# Altium PCB PCB1.PcbDoc
Units mil, origin at the board's own origin, x right, y up, seen from the top; angles counter-clockwise.
Board outline 3166.7 x 2714.2 mil, 2 copper layers (Top Layer, Bottom Layer); 43 components, 25 nets, 95 pads, 411 vias.
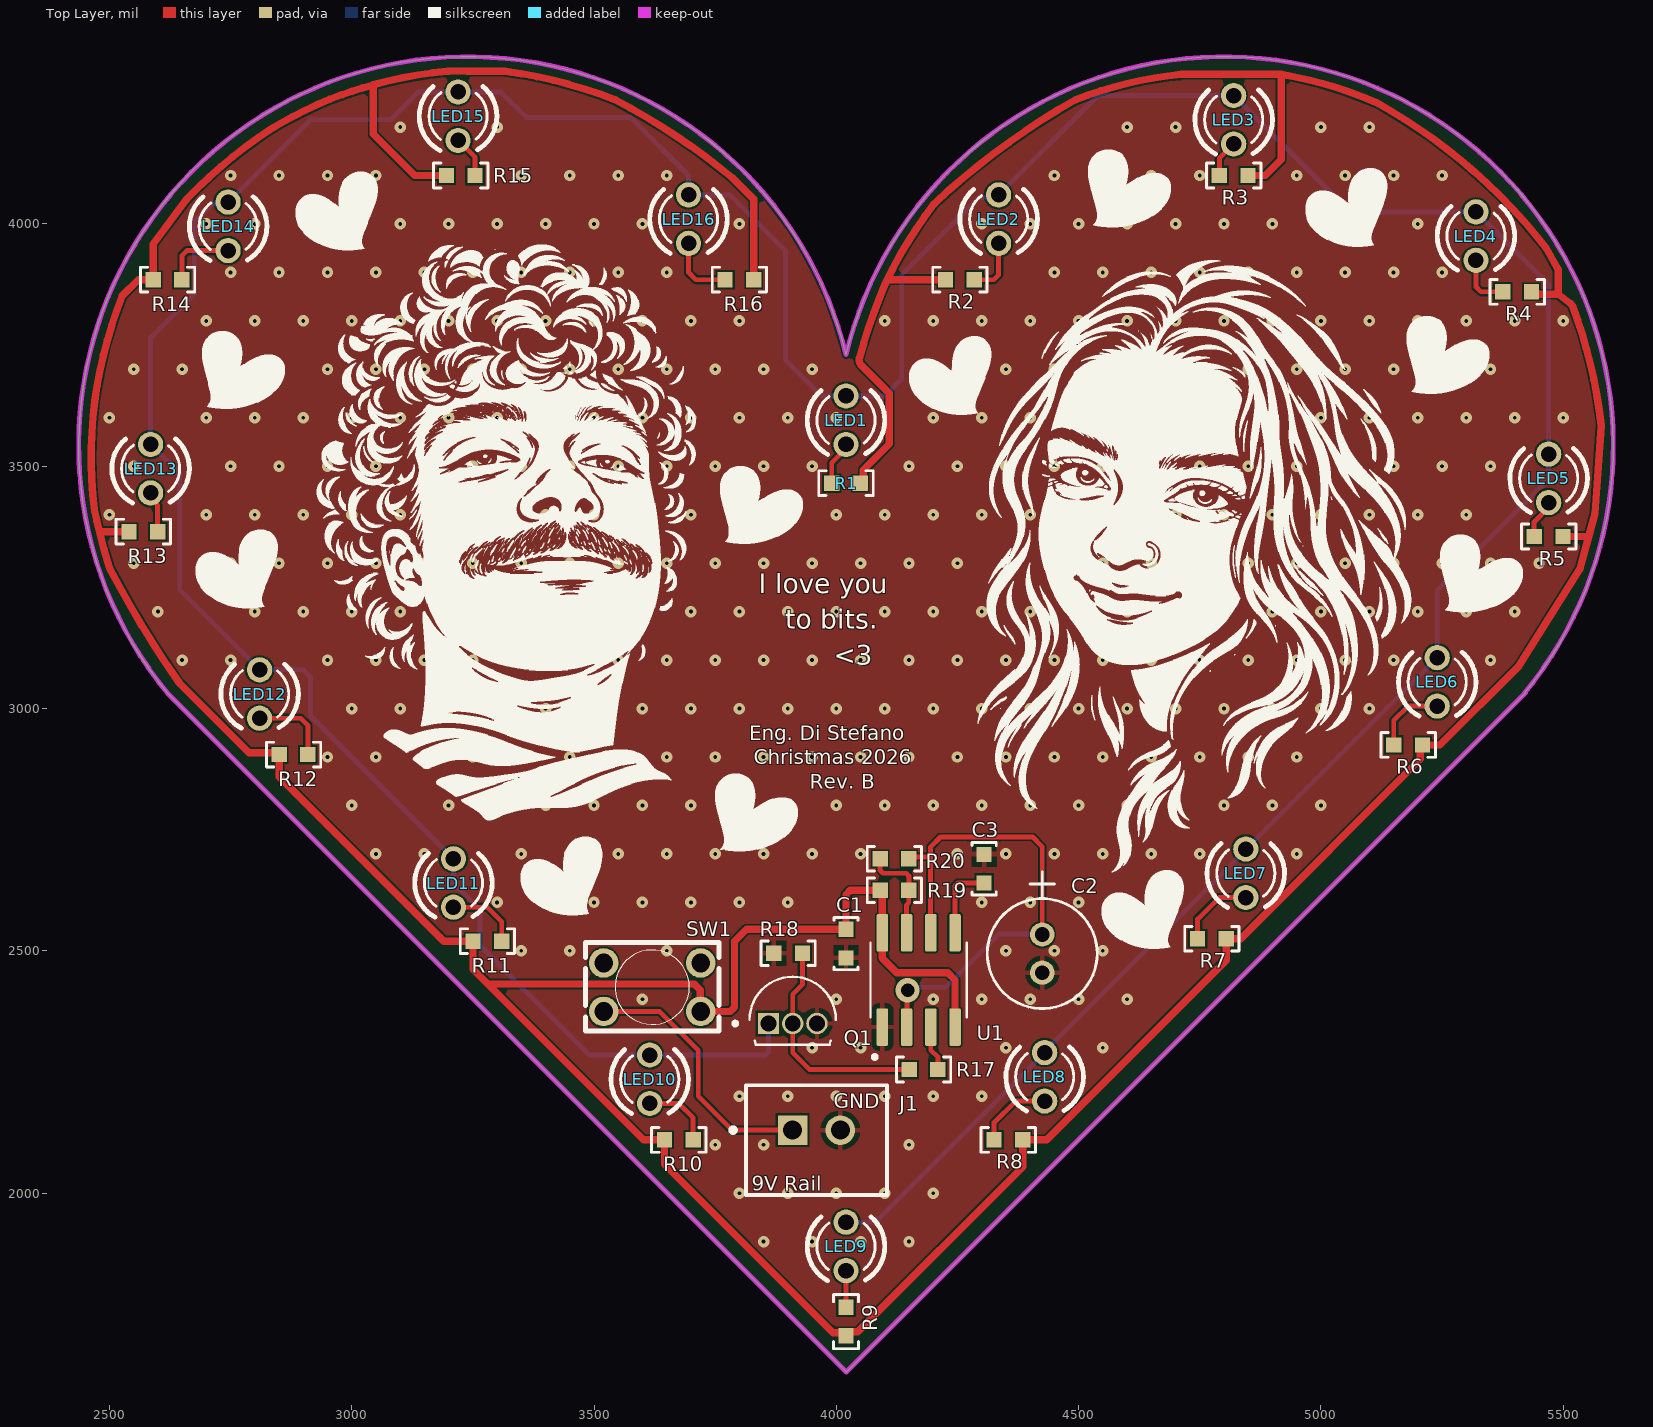
[diagram p0: Top Layer view]
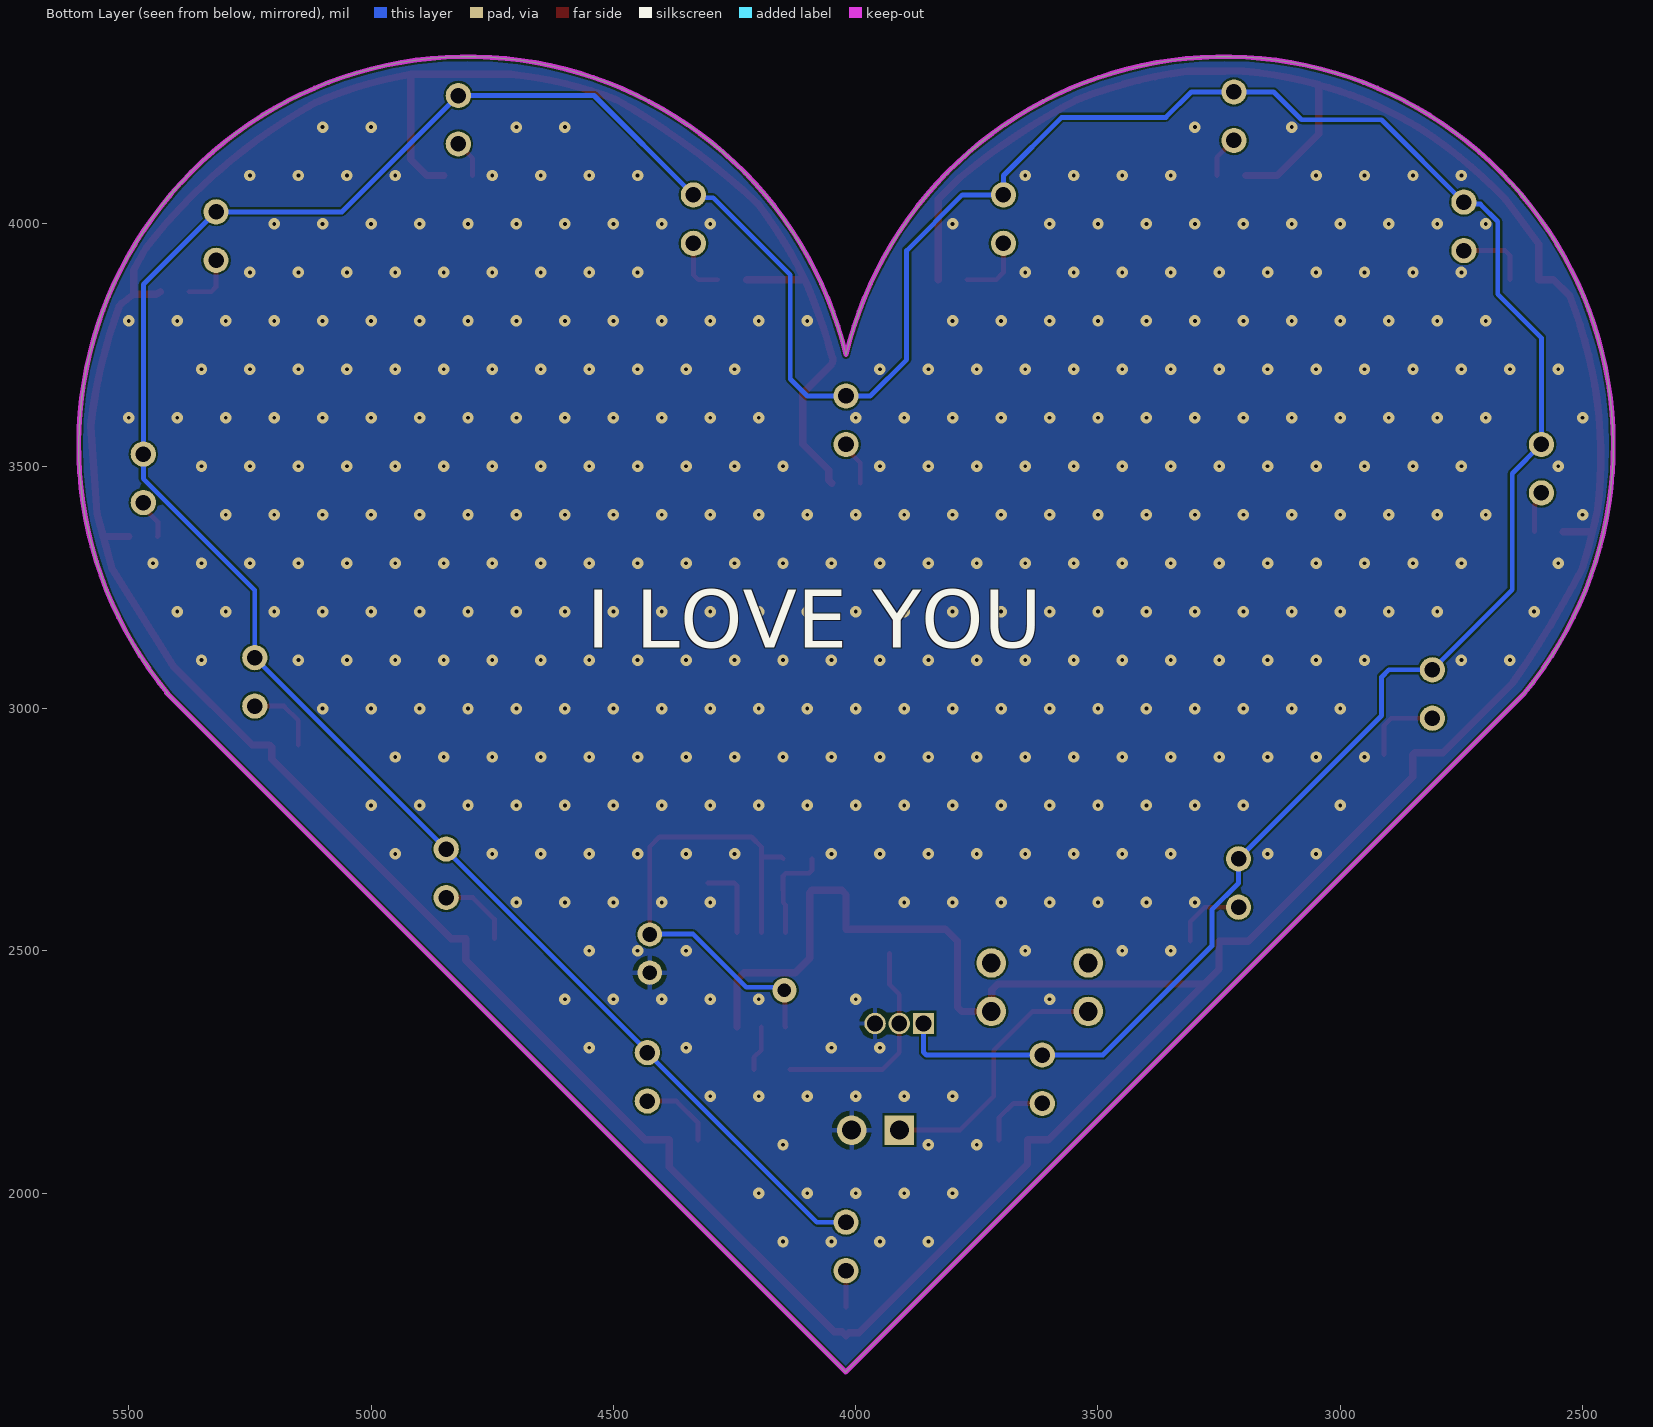
[diagram p1: Bottom Layer view, seen from below]
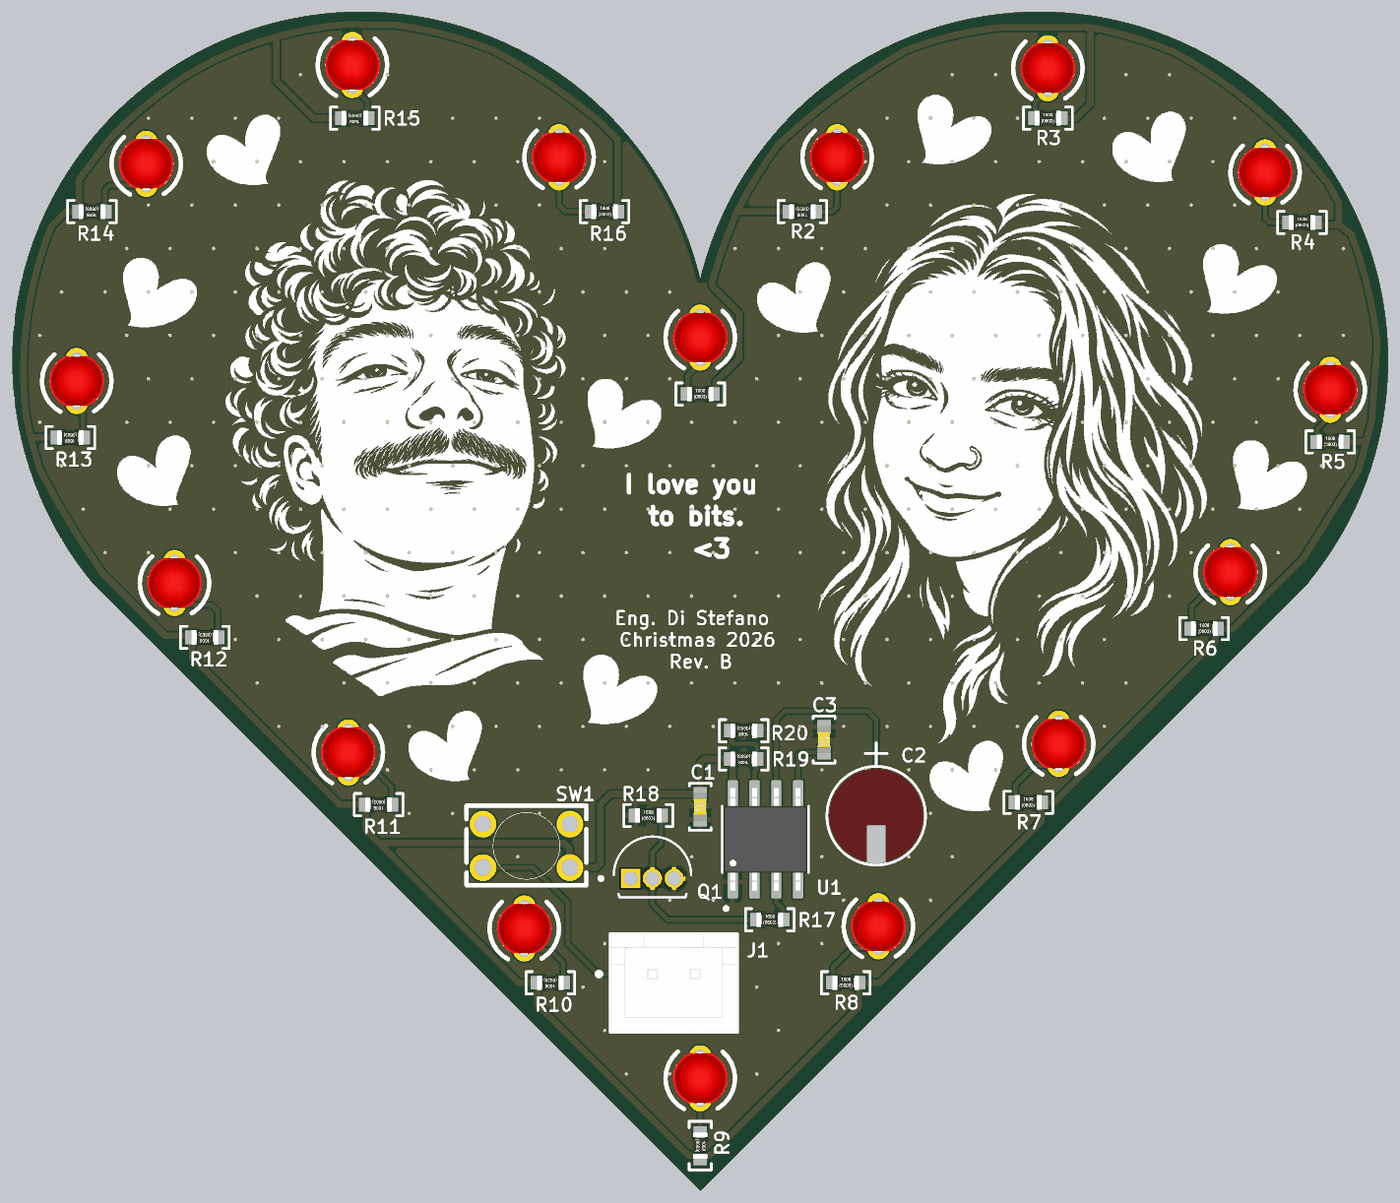
[diagram p2: 3D render of the assembled board from above, using the file's embedded part models]

## Layer stack, top to bottom
Top Solder: solder mask 0.4, Solder Resist, Dk 3.5
Top Layer: signal copper 1.4
Dielectric 1: dielectric 12.6, FR-4, Dk 4.8
Bottom Layer: signal copper 1.4
Bottom Solder: solder mask 0.4, Solder Resist, Dk 3.5

## Board outline
2619.71,3032.11 4020.91,1630.91 5422.11,3032.11 5420.29,3032.11 ccw(c4800.58,3542.44) 4020,3730 ccw(c3239.42,3542.44)

## Design rules (kind name [scope] priority, off if disabled: settings)
Clearance [All] p1: gap=4 ignorepadtopadclearanceinfootprint=FALSE
PolygonConnect PolygonConnect_1 [InNet('GND') vs InNet('GND')] p1: thpad.connectstyle=Relief thpad.reliefconductorwidth=10 thpad.reliefentries=4 thpad.polygonreliefangle="90 Angle" thpad.airgapwidth=10 smdpad.connectstyle=Relief smdpad.reliefconductorwidth=10 smdpad.reliefentries=4 smdpad.polygonreliefangle="90 Angle" smdpad.airgapwidth=10 via.connectstyle=Direct via.reliefconductorwidth=10 via.reliefentries=4 via.polygonreliefangle="90 Angle" via.airgapwidth=10
PolygonConnect [All] p2: connectstyle=Relief reliefconductorwidth=10 reliefentries=4 polygonreliefangle="90 Angle" airgapwidth=10
RoutingVias [All] p1: holewidth=28 width=50 viastyle="Through Hole" minholewidth=28 minwidth=50 maxholewidth=28 maxwidth=50
SilkToSilkClearance [All] p1 off: silktosilkclearance=10
SilkToSolderMaskClearance [IsPad] p1 off: minsilkscreentomaskgap=10 clearancetoexposedcopper=TRUE
SolderMaskExpansion [All] p1: expansion=0 istentingtop=FALSE
SupplyNets "Schematic Supply Nets_1" [InNet('9V')] p1: voltage=0.000
SupplyNets "Schematic Supply Nets" [InNet('GND')] p2: voltage=0.000
Width Width_1 [InNet('9V')] p1: maxlimit=15 minlimit=15 preferedwidth=15 minimp=50.000000 maximp=50.000000 favimp=50.000000
Width [All] p2: maxlimit=10 minlimit=10 preferedwidth=10
28 further rules are at their usual default settings.

## Components (designator, comment, footprint, x,y, rotation, side; value= is the part's Value field where it differs from the comment)
C1 "CAP CER 100nF 50V 0603" C_1608[0603] 4020,2515 r90 top value=100nF
C2 "10uf" CAP_PKPZ_5X11_LOW_RUB 4425,2533.74 r270 top
C3 "CAP CER 100nF 50V 0603" C_1608[0603] 4305,2669.53 r270 top value=10nF
J1 "B2B-XH-A(LF)(SN)" J_B2B-XH-A_LF_JST 3959.21,2109.33 r0 top value="Conn_01x02 TH"
LED1 "TLLR4400" LED3MM 4020,3595 r90 top
LED2 "TLLR4400" LED3MM 4335,4010 r90 top
LED3 "TLLR4400" LED3MM 4820,4215 r90 top
LED4 "TLLR4400" LED3MM 5320,3975 r90 top
LED5 "TLLR4400" LED3MM 5470,3475 r90 top
LED6 "TLLR4400" LED3MM 5240,3055 r90 top
LED7 "TLLR4400" LED3MM 4845,2660 r90 top
LED8 "TLLR4400" LED3MM 4430,2240 r90 top
LED9 "TLLR4400" LED3MM 4020,1890 r90 top
LED10 "TLLR4400" LED3MM 3615,2235 r90 top
LED11 "TLLR4400" LED3MM 3210,2640 r90 top
LED12 "TLLR4400" LED3MM 2810,3030 r90 top
LED13 "TLLR4400" LED3MM 2585,3495 r90 top
LED14 "TLLR4400" LED3MM 2745,3995 r90 top
LED15 "TLLR4400" LED3MM 3219.47,4222.34 r90 top
LED16 "TLLR4400" LED3MM 3695,4010 r90 top
Q1 "BS170" TO92127P478H483-3 3910,2350 r0 top
R1 "Res 10k 1% 0603" R_1608[0603] 4020,3465 r0 top value=3k3
R2 "Res 10k 1% 0603" R_1608[0603] 4255,3885 r180 top value=3k3
R3 "Res 10k 1% 0603" R_1608[0603] 4820,4100 r0 top value=3k3
R4 "Res 10k 1% 0603" R_1608[0603] 5405,3860 r0 top value=3k3
R5 "Res 10k 1% 0603" R_1608[0603] 5470,3355 r0 top value=3k3
R6 "Res 10k 1% 0603" R_1608[0603] 5180,2925 r0 top value=3k3
R7 "Res 10k 1% 0603" R_1608[0603] 4775,2525 r0 top value=3k3
R8 "Res 10k 1% 0603" R_1608[0603] 4355,2110 r0 top value=3k3
R9 "Res 10k 1% 0603" R_1608[0603] 4020,1735 r270 top value=3k3
R10 "Res 10k 1% 0603" R_1608[0603] 3675,2110 r180 top value=3k3
R11 "Res 10k 1% 0603" R_1608[0603] 3280,2520 r180 top value=3k3
R12 "Res 10k 1% 0603" R_1608[0603] 2880,2905 r180 top value=3k3
R13 "Res 10k 1% 0603" R_1608[0603] 2570,3365 r180 top value=3k3
R14 "Res 10k 1% 0603" R_1608[0603] 2620,3885 r180 top value=3k3
R15 "Res 10k 1% 0603" R_1608[0603] 3225,4100 r180 top value=3k3
R16 "Res 10k 1% 0603" R_1608[0603] 3800,3885 r0 top value=3k3
R17 "Res 10k 1% 0603" R_1608[0603] 4180,2255 r0 top value=220
R18 "Res 10k 1% 0603" R_1608[0603] 3900.47,2495 r0 top value=100k
R19 "Res 10k 1% 0603" R_1608[0603] 4120,2625 r180 top value=10k
R20 "Res 10k 1% 0603" R_1608[0603] 4120,2690 r180 top value=63k
SW1 "CST10T2CR" CST10T2CR 3620,2425 r0 top
U1 "LMC555" SOIC127P599X175-8N 4170,2440 r90 top

## Footprints (in the part's own frame and the unit in brackets; to place one, negate y for a bottom-side part, rotate by r counter-clockwise, add the part's x,y. Pads: shape width x height; smd on the part's side, far side on the other; paste and mask are expansions set on the pad)
C_1608[0603] [mm] "Capacitor MLCC; Body 1.6 x 0.8 mm (LxW typ)"
  rect 0.8x0.8 smd: 1(-0.75,0) 2(0.75,0)
  silkscreen extent -1.38,-0.64 1.38,0.64, body extent -0.8,-0.4 0.8,0.4, height 0.8
CAP_PKPZ_5X11_LOW_RUB [mil]
  round 50 / inner round 60 / far side round 50 hole 30 paste-99999 mask+0: 1(0,0) 2(78.74,0)
  silkscreen extent -129,-113 153,114, body extent -69,-108 149,108, height 493
CST10T2CR [mm] "Toggle Switches. CST10T2CR"
  round 1.55 hole 0.98: 1(-2.54,-1.27) 3(2.54,-1.27) 4(2.54,1.27) 6(-2.54,1.27)
  silkscreen extent -3.5,-2.3 3.5,2.35
J_B2B-XH-A_LF_JST [mm]
  rect 1.55x1.55 hole 1 paste-2539.97 mask+0: 1(-1.25,0.525)
  round 1.55 hole 1 paste-2539.97 mask+0: 2(1.25,0.525)
  silkscreen extent -4.5,-2.88 3.7,2.88, body extent -3.8,-2.98 3.8,2.98, height 0.25
LED3MM [mil]
  round 52 hole 32: A(-50,0) K(50,0)
  silkscreen extent -71,-80 61,80, body extent -60,-62 60,62, height 240
R_1608[0603] [mm] "Chip Resistor; Body 1.6 x 0.8 mm (LxW typ)"
  rect 0.8x0.8 smd: 1(-0.75,0) 2(0.75,0)
  silkscreen extent -1.43,-0.65 1.43,0.65, body extent -0.77,-0.42 0.78,0.43, height 0.45
SOIC127P599X175-8N [mm]
  rrect25% 1.97x0.6 smd: 1(-2.47,1.905) 2(-2.47,0.635) 3(-2.47,-0.635) 4(-2.47,-1.905) 5(2.47,-1.905) 6(2.47,-0.635) 7(2.47,0.635) 8(2.47,1.905)
  silkscreen extent -4.14,-2.52 1.95,2.52, body extent -3,-2.45 3,2.45, height 1.75
TO92127P478H483-3 [mm]
  rect 1.12x1.12 / inner round 1.12 / far side rect 1.12x1.12 hole 0.83 mask+0.102: 1(-1.27,0)
  round 1.12 hole 0.83 mask+0.102: 2(0,0) 3(1.27,0)
  silkscreen extent -3.11,-1.1 2.26,2.45

## Part data
C1 C3: library part CAP002, "Capacitor type 1", Dielectric=X7R, Manufacturer 1=Yageo, Manufacturer Part Number 1=CC0603KRX7R9BB104, Rated Voltage=50V, Supplier Part Number 1=C14663, Tolerance=10%, Code CEGEP=COND0143SM, LibRef=CAP002, Mounting Technology=SMT, Supplier 1=LCSC
C2: library part 50PK10MEFC5X11, "Description", Manufacturer_Name=Rubycon, Copyright="Copyright (C) 2025 Ultra Librarian. All rights reserved.", Manufacturer_Part_Number=50PK10MEFC5X11
J1: library part CONN-2MM-01X02-B2B, "Conn. 2 pins JST B2B TH Straight 2mm", Manufacturer 1=JST, Supplier Part Number 1=C158012, Manufacturer Part Number 1=B2B-XH-A(LF)(SN), Mounting Technology=SMT, Supplier 1=LCSC, Supplier 2=Farnell, Supplier Part Number 2=1516276
LED1 LED2 LED3 LED4 LED5 LED6 LED7 LED8 LED9 LED10 LED11 LED12 LED13 LED14 LED15 LED16: "Red 619nm LED Indication - Discrete 1.9V Radial", Package=None, Check_prices=https://www.snapeda.com/parts/TLLR4400/Vishay+Semiconductor+Opto+Division/view-part/?ref=eda, MF=Vishay, MP=TLLR4400, SnapEDA_Link=https://www.snapeda.com/parts/TLLR4400/Vishay+Semiconductor+Opto+Division/view-part/?ref=snap
Q1: "N-Channel 60 V 500mA (Ta) 830mW (Ta) Through Hole TO-92-3", Manufacturer=ON, Package=Package, DATASHEET_URL=https://s3.amazonaws.com/snapeda/datasheet/BS170_NTE_Electronics-_Inc.pdf, MPN=BS170, SOURCE_URL=https://www.snapeda.com/parts/BS170/Onsemi/view-part/
R1 R2 R3 R4 R5 R6 R7 R8 R9 R10 R11 R12 R13 R14 R15 R16 R17 R18 R19 R20: library part RES001, "Resistor type 1", Manufacturer 1=Yageo, Manufacturer Part Number 1=RC0603FR-0710KL, Max Working Voltage=75V, Supplier Part Number 1=C98220, Tolerance=1%, Code CEGEP=RESI0238-0603, LibRef=RES001, Mounting Technology=SMT, Puissance=1/10W, Supplier 1=LCSC
SW1: "Toggle Switches. CST10T2CR", JLCPCB Part #=C4949894, Manufacturer="CIT Relay and Switch", Component Type=Switches, Design Item ID=CST10T2CR, Manufacturer Part Number=CST10T2CR
U1: library part LM555CM/NOPB, "Highly Stable 555 Timer", Package="SOIC-8 Texas Instruments", Check_prices=https://www.snapeda.com/parts/LM555CM/NOPB/Texas+Instruments/view-part/?ref=eda, MF="Texas Instruments", MP=LM555CM/NOPB, SnapEDA_Link=https://www.snapeda.com/parts/LM555CM/NOPB/Texas+Instruments/view-part/?ref=snap

## Via types
v1: diameter 23.62, hole 7.8, Top Layer to Bottom Layer, tented both sides, 410 vias
v2: diameter 50, hole 28, Top Layer to Bottom Layer, tented both sides, 1 vias

## Nets (pads, with @x,y where several pads share a name; then routed paths per layer and width w, separated by ;. In a path a pad name is that pad's centre, name@x,y a point inside that pad or via, vN(x,y) a via of type N, cw(c..) or ccw(c..) an arc to the next point about the centre after c; other vN are vias at no path point)
9V: C1.2 R1.2 R2.2 R3.2 R4.2 R5.2 R6.2 R7.2 R8.2 R9.2 R10.2 R11.2 R12.2 R13.2 R14.2 R15.2 R16.2 R19.2 SW1.3 U1.4 U1.8 | length 12058.7
  Top Layer w15: R13.2 2479.5,3365 2479.33,3364.83 ; R15.2 3130,4100 3044.39,4185.61 3044.39,4287.2 ; 3785.23,4095.27 3829.53,4050.98 R16.2 ; 3785.23,4095.28 ccw(c2894.2,3020.08) 3543.97,4256.12 ccw(c3191.45,3363.52) 3316.08,4315.08 3238.25,4315.08 3237.49,4315.84 3201.45,4315.84 3200.69,4315.08 3197.52,4315.08 ccw(c3271.57,3473.8) 3044.39,4287.2 ; R1.2 4055.55,3471.03 4055.55,3492.29 4109.33,3546.07 4109.33,3650.67 4051.35,3708.65 cw(c4061.96,3719.25) 4047.48,3723.17 cw(c5203.85,3404.01) 4101.77,3877.79 cw(c4115.52,3871.81) 4108.38,3885 R2.2 ; 4102.67,3881.27 cw(c5014.52,3429.54) 4201.24,4041.18 cw(c5259.67,2909.59) 4202.2,4042.09 cw(c5259.67,2909.59) 4492.66,4255.87 cw(c4793.7,3489.81) 4711.49,4308.79 4917.8,4308.79 cw(c4771.42,3444.15) 4917.96,4308.76 ; U1.4 4245,2440 4230,2455 4125,2455 4095,2485 U1.8 4095,2620.47 R19.2 4028.79,2625 4020,2616.21 C1.2 3814.53,2544.53 3790,2520 3790,2383.79 3781.21,2375 SW1.3 3719.21,2375.79 3719.21,2419.18 3706.89,2431.5 3280.82,2431.5 ; R3.2 4885,4100 4917.95,4132.95 4917.95,4308.74 ; R4.2 5442.78,3855 5488.11,3855 5489.59,3855 5489.6,3905.31 5464.52,3950.67 ccw(c4558.97,3246.87) 5463.79,3951.6 ccw(c4558.97,3246.87) 5113.43,4250.82 ccw(c4775.96,3470.94) 4917.96,4308.76 ; 5489.59,3854.93 5515.38,3835.24 5516.18,3834.63 5516.89,3833.93 5519.21,3831.61 cw(c4542.65,3467.28) 5578.36,3584.32 5578.26,3582.94 5566.5,3416.7 5565.56,3403.4 ; R5.2 5549.73,3355 5553.73,3359.01 ; 5565.16,3401.9 5553.73,3359.01 ; 2479.33,3364.83 ccw(c3823.05,3701.71) 2500.12,3290.72 ccw(c4320.71,4230.71) 2644.12,3052.93 2788,2909.05 2846.42,2909.05 R12.2 2850.47,2859.53 3190,2520 R11.2 3250.47,2461.85 3280.82,2431.5 ; 2479.33,3364.83 cw(c3823.05,3701.71) 2469.16,3408.4 2469.01,3409.08 cw(c3361.36,3517.93) 2526.62,3851.62 2560,3885 R14.2 2590.47,3958.63 2659.44,4051.07 cw(c3395.32,3345.68) 2660.08,4051.75 cw(c3395.32,3345.68) 2832.3,4195.45 cw(c3267.63,3483.91) 2980.35,4267.03 2980.72,4266.67 cw(c3271.57,3473.8) 3044.39,4287.2 ; 3280.82,2431.5 3602.32,2110 R10.2 3645.47,2059.86 3993.27,1712.06 4013.41,1712.06 R9.2 4028.25,1713.72 4044.31,1713.72 4384.53,2053.94 R8.2 4434.1,2110 4804.53,2480.43 R7.2 4834.32,2525 5205.27,2895.95 5205.27,2920.74 R6.2 5245.82,2925 5408.34,3087.52 5534.37,3287.62 5535.06,3288.94 5553.73,3359.01
GND: C1.1 C2.2 C3.1 J1.2 Q1.3 R18.1 U1.1
  other v1: 3850,1900 3950,1900 4050,1900 4150,1900 3800,2000 3900,2000 4000,2000 4100,2000 4200,2000 3750,2100 3850,2100 4150,2100 3800,2200 3900,2200 4000,2200 4100,2200 4200,2200 4300,2200 3950,2300 4050,2300 4350,2300 4550,2300 3600,2400 4000,2400 4200,2400 4300,2400 4400,2400 4500,2400 4600,2400 3350,2500 3450,2500 3650,2500 4350,2500 4450,2500 4550,2500 3300,2600 3400,2600 3500,2600 3600,2600 3700,2600 3800,2600 3900,2600 4300,2600 4400,2600 4500,2600 4600,2600 4700,2600 3050,2700 3150,2700 3350,2700 3450,2700 3550,2700 3650,2700 3750,2700 3850,2700 3950,2700 4050,2700 4250,2700 4350,2700 4450,2700 4550,2700 4650,2700 4750,2700 4950,2700 3000,2800 3200,2800 3300,2800 3400,2800 3500,2800 3600,2800 3700,2800 3800,2800 3900,2800 4000,2800 4100,2800 4200,2800 4300,2800 4400,2800 4500,2800 4600,2800 4700,2800 4800,2800 4900,2800 5000,2800 2950,2900 3050,2900 3150,2900 3250,2900 3350,2900 3450,2900 3550,2900 3650,2900 3750,2900 3850,2900 3950,2900 4050,2900 4150,2900 4250,2900 4350,2900 4450,2900 4550,2900 4650,2900 4750,2900 4850,2900 4950,2900 3000,3000 3100,3000 3200,3000 3300,3000 3400,3000 3500,3000 3600,3000 3700,3000 3800,3000 3900,3000 4000,3000 4100,3000 4200,3000 4300,3000 4400,3000 4500,3000 4600,3000 4700,3000 4800,3000 4900,3000 5000,3000 5100,3000 2650,3100 2750,3100 2950,3100 3050,3100 3150,3100 3250,3100 3350,3100 3450,3100 3550,3100 3650,3100 3750,3100 3850,3100 3950,3100 4050,3100 4150,3100 4250,3100 4350,3100 4450,3100 4550,3100 4650,3100 4750,3100 4850,3100 4950,3100 5050,3100 5150,3100 5350,3100 2600,3200 2800,3200 2900,3200 3000,3200 3100,3200 3200,3200 3300,3200 3400,3200 3500,3200 3600,3200 3700,3200 3800,3200 3900,3200 4000,3200 4100,3200 4200,3200 4300,3200 4400,3200 4500,3200 4600,3200 4700,3200 4800,3200 4900,3200 5000,3200 5100,3200 5200,3200 5300,3200 5400,3200 2550,3300 2750,3300 2850,3300 2950,3300 3050,3300 3150,3300 3250,3300 3350,3300 3450,3300 3550,3300 3650,3300 3750,3300 3850,3300 3950,3300 4050,3300 4150,3300 4250,3300 4350,3300 4450,3300 4550,3300 4650,3300 4750,3300 4850,3300 4950,3300 5050,3300 5150,3300 5250,3300 5350,3300 5450,3300 2500,3400 2700,3400 2800,3400 2900,3400 3000,3400 3100,3400 3200,3400 3300,3400 3400,3400 3500,3400 3600,3400 3700,3400 3800,3400 3900,3400 4000,3400 4100,3400 4200,3400 4300,3400 4400,3400 4500,3400 4600,3400 4700,3400 4800,3400 4900,3400 5000,3400 5100,3400 5200,3400 5300,3400 2550,3500 2750,3500 2850,3500 2950,3500 3050,3500 3150,3500 3250,3500 3350,3500 3450,3500 3550,3500 3650,3500 3750,3500 3850,3500 3950,3500 4150,3500 4250,3500 4350,3500 4450,3500 4550,3500 4650,3500 4750,3500 4850,3500 4950,3500 5050,3500 5150,3500 5250,3500 5350,3500 2500,3600 2700,3600 2800,3600 2900,3600 3000,3600 3100,3600 3200,3600 3300,3600 3400,3600 3500,3600 3600,3600 3700,3600 3800,3600 3900,3600 4000,3600 4200,3600 4300,3600 4400,3600 4500,3600 4600,3600 4700,3600 4800,3600 4900,3600 5000,3600 5100,3600 5200,3600 5300,3600 5400,3600 5500,3600 2550,3700 2650,3700 2750,3700 2850,3700 2950,3700 3050,3700 3150,3700 3250,3700 3350,3700 3450,3700 3550,3700 3650,3700 3750,3700 3850,3700 3950,3700 4250,3700 4350,3700 4450,3700 4550,3700 4650,3700 4750,3700 4850,3700 4950,3700 5050,3700 5150,3700 5250,3700 5350,3700 2700,3800 2800,3800 2900,3800 3000,3800 3100,3800 3200,3800 3300,3800 3400,3800 3500,3800 3600,3800 3700,3800 3800,3800 4100,3800 4200,3800 4300,3800 4400,3800 4500,3800 4600,3800 4700,3800 4800,3800 4900,3800 5000,3800 5100,3800 5200,3800 5300,3800 5400,3800 5500,3800 2750,3900 2850,3900 2950,3900 3050,3900 3150,3900 3250,3900 3350,3900 3450,3900 3550,3900 3650,3900 4450,3900 4550,3900 4650,3900 4750,3900 4850,3900 4950,3900 5050,3900 5150,3900 5250,3900 2700,4000 2800,4000 2900,4000 3000,4000 3100,4000 3200,4000 3300,4000 3400,4000 3500,4000 3600,4000 3800,4000 4300,4000 4400,4000 4500,4000 4600,4000 4700,4000 4800,4000 4900,4000 5000,4000 5100,4000 5200,4000 2750,4100 2850,4100 2950,4100 3050,4100 3350,4100 3450,4100 3550,4100 3650,4100 4450,4100 4550,4100 4650,4100 4750,4100 4950,4100 5050,4100 5150,4100 5250,4100 3100,4200 3300,4200 4600,4200 4700,4200 5000,4200 5100,4200
NetC2_1: C2.1 R20.1 U1.2 U1.6 | length 1052.2
  Top Layer w10: U1.2 4146.02,2343.77 4146.02,2417.48 v2(4147.04,2418.5) ; R20.1 4153.31,2693.78 4194.26,2693.78 4194.53,2694.06 4194.53,2714.53 4215,2735 4405,2735 4425,2715 C2.1 ; 4194.53,2690 4194.26,2689.73 4194.26,2537.99 U1.6
  Bottom Layer w10: v2(4147.04,2418.5) 4153.54,2425 4225.86,2425 4335.86,2535 4423.74,2535 C2.1
NetC3_2: C3.2 U1.5 | length 159.3
  Top Layer w10: U1.5 4245,2634.14 4250.86,2640 C3.2
NetJ1_1: J1.1 SW1.1 | length 547.1
  Top Layer w10: SW1.1 3635,2375 3715,2295 3715,2200 3785,2130 J1.1
NetLED1_A: LED1.A R1.1 | length 92.2
  Top Layer w10: R1.1 3990.47,3506.79 4020,3536.32 LED1.A
NetLED1_K: LED1.K LED2.K LED3.K LED4.K LED5.K LED6.K LED7.K LED8.K LED9.K LED10.K LED11.K LED12.K LED13.K LED14.K LED15.K LED16.K Q1.1 | length 9052.3
  Bottom Layer w10: Q1.1 3860,2290.86 3854.14,2285 LED10.K 3490,2285 3265,2510 3265,2584.5 3210,2639.5 LED11.K 2915,2985 2915,3065 2900,3080 LED12.K 2645,3245 2645,3485 LED13.K 2585,3765 2675,3855 2675,4005 2711.01,4041.01 2741.01,4041.01 LED14.K 2915,4215 3080,4215 3137.34,4272.34 LED15.K 3307.66,4272.34 3360,4220 3575,4220 3695,4100 LED16.K 3780,4060 3895,3945 3895,3720 3970,3645 LED1.K 4100,3645 4135,3680 4135,3895 4294,4054 4329,4054 LED2.K 4540,4265 LED3.K 5060,4025 LED4.K 5470,3875 LED5.K 5470,3474.5 5240,3244.5 LED6.K LED7.K 4845,2707.5 4430,2292.5 LED8.K 4080,1940 LED9.K
NetLED2_A: LED2.A R2.1 | length 119.6
  Top Layer w10: R2.1 4325,3885 4335,3895 LED2.A
NetLED3_A: LED3.A R3.1 | length 77.2
  Top Layer w10: R3.1 4790.47,4135.47 LED3.A
NetLED4_A: LED4.A R4.1 | length 114.6
  Top Layer w10: LED4.A 5320,3870 5330,3860 R4.1
NetLED5_A: LED5.A R5.1 | length 82.6
  Top Layer w10: R5.1 5440,3355.47 5440,3385 5470,3415 LED5.A
NetLED6_A: LED6.A R6.1 | length 152.2
  Top Layer w10: R6.1 5150.47,2975.47 5180,3005 LED6.A
NetLED7_A: LED7.A R7.1 | length 158.4
  Top Layer w10: R7.1 4745.47,2565.47 4790,2610 LED7.A
NetLED8_A: LED8.A R8.1 | length 158.4
  Top Layer w10: R8.1 4325.47,2145.47 4370,2190 LED8.A
NetLED9_A: LED9.A R9.1 | length 75.5
  Top Layer w10: R9.1 LED9.A
NetLED10_A: LED10.A R10.1 | length 147.2
  Top Layer w10: LED10.A 3675,2185 3704.53,2155.47 R10.1
NetLED11_A: LED11.A R11.1 | length 152.2
  Top Layer w10: LED11.A 3280,2590 3309.53,2560.47 R11.1
NetLED12_A: LED12.A R12.1 | length 166
  Top Layer w10: LED12.A 2895,2980 2909.53,2965.47 R12.1
NetLED13_A: LED13.A R13.1 | length 86
  Top Layer w10: LED13.A 2585,3433.63 2599.53,3419.11 R13.1
NetLED14_A: LED14.A R14.1 | length 149.3
  Top Layer w10: R14.1 2650,3885.47 2650,3935 2660,3945 LED14.A
NetLED15_A: LED15.A R15.1 | length 86.9
  Top Layer w10: LED15.A 3254.53,4137.29 R15.1
NetLED16_A: LED16.A R16.1 | length 141.7
  Top Layer w10: LED16.A 3695,3900 3710,3885 R16.1
NetQ1_2: Q1.2 R17.1 R18.2 | length 453.3
  Top Layer w10: R18.2 3930,2430 3910,2410 Q1.2 3910,2290 3945,2255 R17.1@4135.47,2255
NetR19_1: R19.1 R20.2 U1.7 | length 207.5
  Top Layer w10: R20.2 4090.47,2665.86 4096.33,2660 4144.14,2660 4150,2654.14 4150,2625.47 R19.1 4149.53,2599.53 4145,2595 U1.7
OUT555: R17.2 U1.3 | length 94.2
  Top Layer w10: U1.3 4195,2295 4210,2280 4210,2255.47 R17.2
pads on no net: SW1.4 SW1.6

## Polygon pours and split planes (outlines as drawn)
GND on Bottom Layer "GND_L02_P001" (solid, remove dead copper, pour order 1): 2619.71,3032.11 4020.91,1630.91 5422.11,3032.11 5420.29,3032.11 ccw(c4800.58,3542.44) 4020,3730 ccw(c3239.42,3542.44)
GND on Top Layer "GND_L01_P000" (solid, remove dead copper, pour order 0): 2619.71,3032.11 4020.91,1630.91 5422.11,3032.11 5420.29,3032.11 ccw(c4800.58,3542.44) 4020,3730 ccw(c3239.42,3542.44)

## Keep-outs
Keep-Out Layer:
  lines w10: 5420.29,3032.11 ccw(c4800.58,3542.44) 4020,3730 ccw(c3239.42,3542.44) 2619.71,3032.11 4020.91,1630.91 5422.11,3032.11

## Silkscreen, mask and mechanical layers (free items; w line width, h text height)
Top Overlay:
  drawing of 488 lines, arcs and shapes, not listed
  text "I love you" at 3840,3238.33 h40
  text "to bits." at 3895,3165 h40
  text "<3" at 3995,3090 h40
  text "Eng. Di Stefano" at 3820,2935 h30
  text "Christmas 2026" at 3830,2885 h30
  text "Rev. B" at 3945,2835 h30
  text "GND" at 3995,2175 h30
  text "9V Rail" at 3825,2005 h30
Bottom Overlay:
  text "I LOVE YOU" at 4555,3125 h120